# Altium PCB MicroMMC_SM_Cap.PcbDoc
Units mm, origin at the board's own origin, x right, y up, seen from the top; angles counter-clockwise.
Board outline 26 x 25 mm, 2 copper layers (Top Layer, Bottom Layer), stack 1.534 mm thick; 11 components, 2 nets, 26 pads, 0 vias.
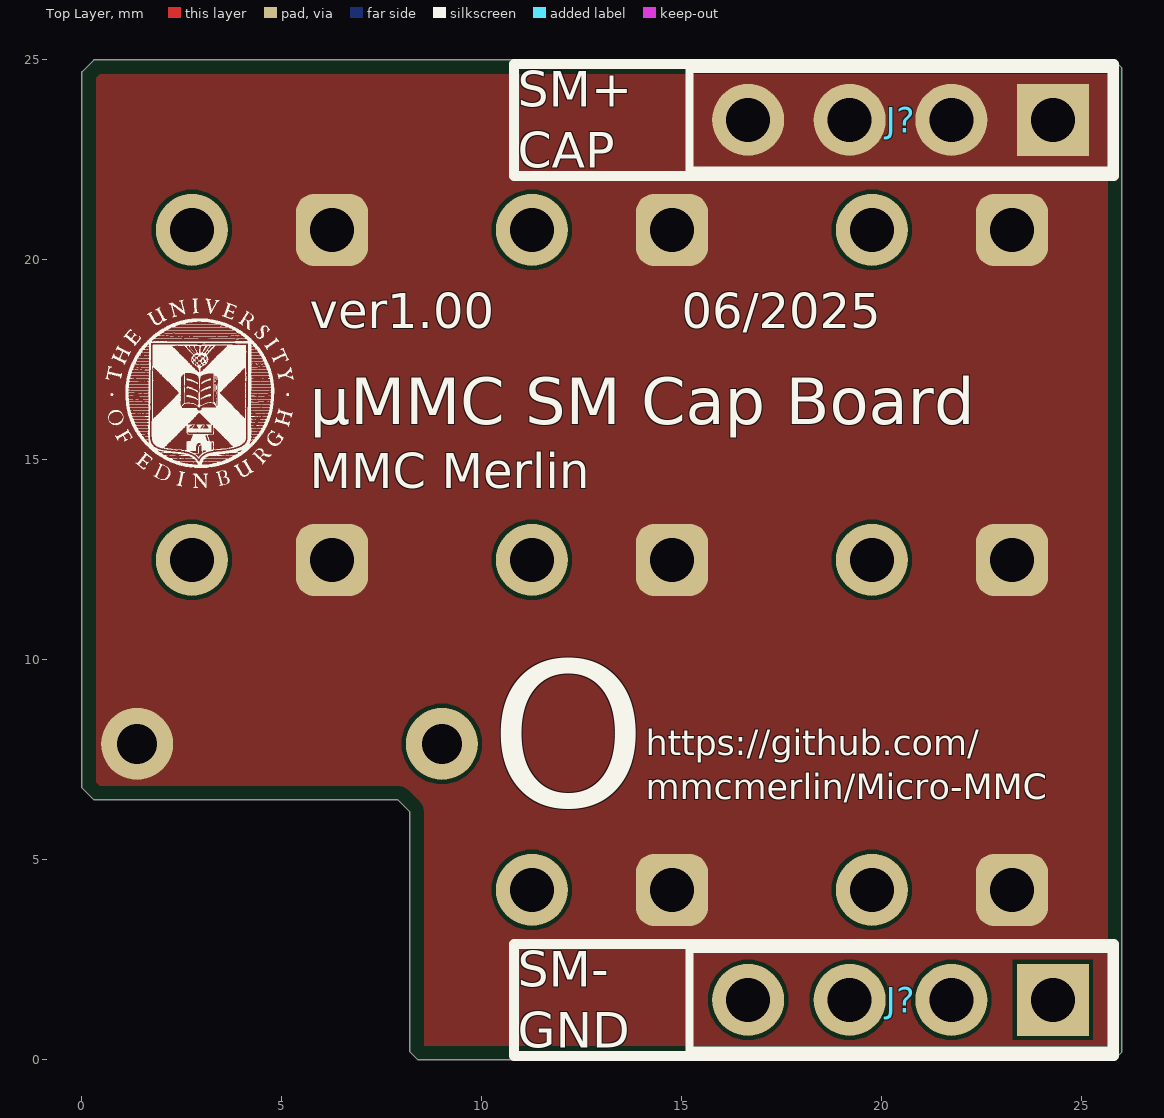
[diagram p0: Top Layer view]
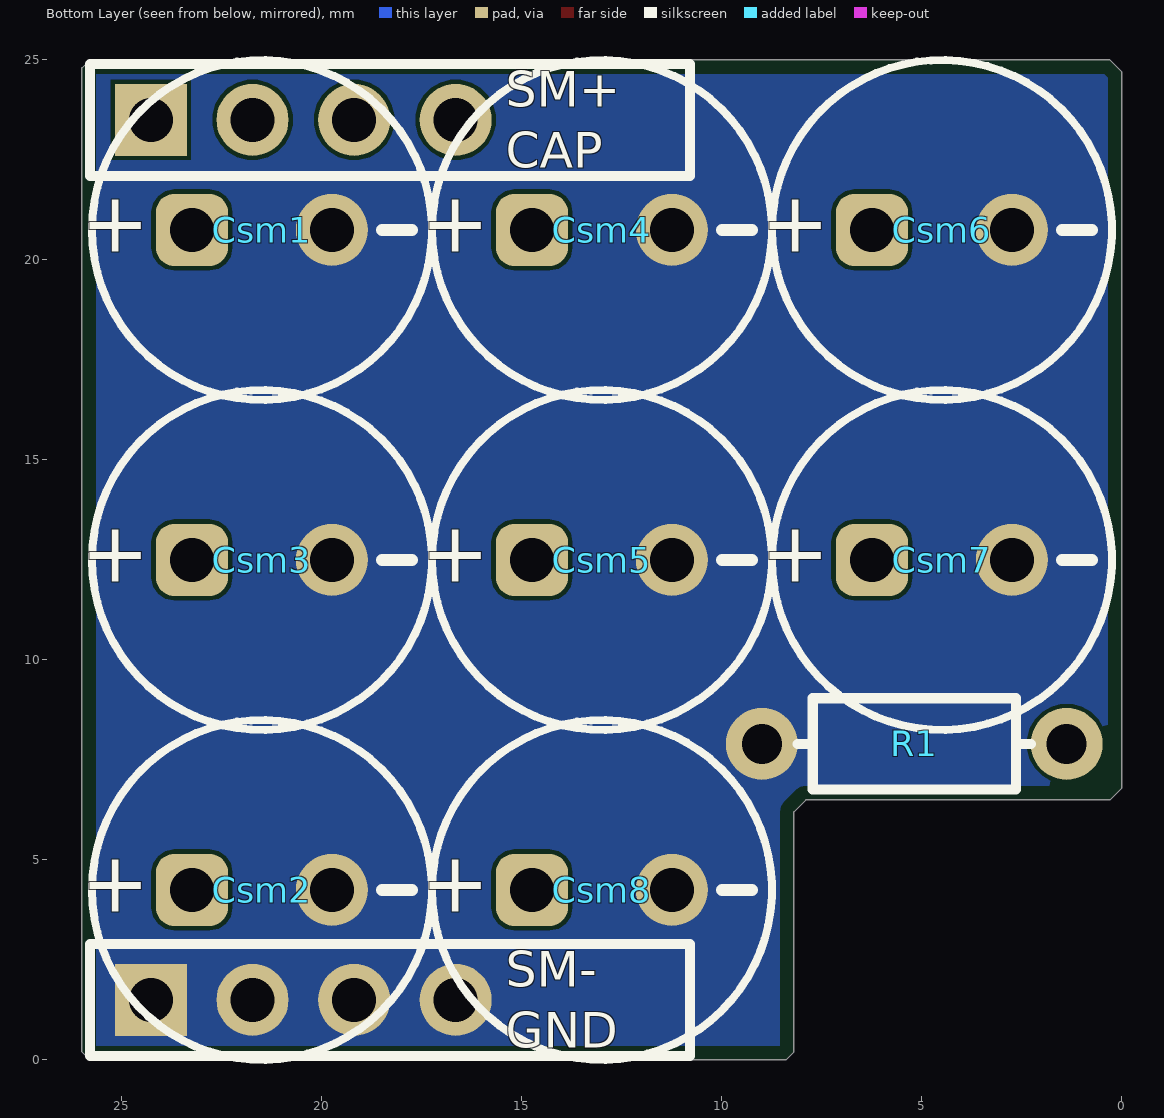
[diagram p1: Bottom Layer view, seen from below]

## Layer stack, top to bottom
Top Solder: solder mask 0.0127, Solder Resist, Dk 3.3
Top Layer: signal copper 0.0178
Dielectric1: core 1.4986, FR-4, Dk 4.3
Bottom Layer: signal copper 0.0178
Bottom Solder: solder mask 0.0127, Solder Resist, Dk 3.3

## Board outline
0,6.8 0,24.7 0.3,25 25.8,25 26,24.8 26,0.2 25.8,0 8.4,0 8.2,0.2 8.2,6.2 7.9,6.5 0.3,6.5

## Design rules (kind name [scope] priority, off if disabled: settings)
BoardOutlineClearance [All] p1: gap=0.35 ignorepadtopadclearanceinfootprint=FALSE
Clearance [All] p1: gap=0.1 ignorepadtopadclearanceinfootprint=FALSE
Height [All] p1: minheight=0 maxheight=100 prefheight=12.7
HoleSize [All] p1: absolutevalues=TRUE maxlimit=6 minlimit=0.25 maxpercent=80.000 minpercent=20.000
HoleToHoleClearance [All] p1: gap=0.6 allowstackedmicrovias=TRUE
MinimumSolderMaskSliver [All] p1: minsoldermaskwidth=0.1
PlaneConnect [All] p1: planeconnectstyle=Direct reliefexpansion=0.508 reliefentries=4 reliefconductorwidth=0.254 reliefairgap=0.254
PolygonConnect [All] p1: connectstyle=Direct reliefconductorwidth=0.254 reliefentries=4 polygonreliefangle="90 Angle" airgapwidth=0.254
RoutingVias [All] p1: holewidth=1 width=2 viastyle="Through Hole" minholewidth=0.3 minwidth=0.45 maxholewidth=6 maxwidth=12
SolderMaskExpansion [Not IsVia] p1: expansion=0.102 istentingtop=FALSE
SolderMaskExpansion SolderMaskExpansion_via [IsVia] p2: expansion=0.102 istentingtop=TRUE
SupplyNets "Schematic Supply Nets_3" [InNet('GND_SM')] p1: voltage=0.000
SupplyNets "Schematic Supply Nets_2" [InNet('VCAP_SM')] p2: voltage=0.000
UnRoutedNet [All] p1: checkbadconnections=TRUE
Width [All] p1: maxlimit=0.762 minlimit=0.152 preferedwidth=0.381
24 further rules are at their usual default settings.

## Classes and differential pairs
component class Schematic: Csm1 Csm2 Csm3 Csm4 Csm5 Csm6 Csm7 Csm8 J? R1

## Components (designator, comment, footprint, x,y, rotation, side; value= is the part's Value field where it differs from the comment)
Csm1 "860010474012" WCAP-ATG8_D8H11.5 21.5,20.75 r0 bottom value=470uF
Csm2 "860010474012" WCAP-ATG8_D8H11.5 21.5,4.25 r0 bottom value=470uF
Csm3 "860010474012" WCAP-ATG8_D8H11.5 21.5,12.5 r0 bottom value=470uF
Csm4 "860010474012" WCAP-ATG8_D8H11.5 13,20.75 r0 bottom value=470uF
Csm5 "860010474012" WCAP-ATG8_D8H11.5 13,12.5 r0 bottom value=470uF
Csm6 "860010474012" WCAP-ATG8_D8H11.5 4.5,20.75 r0 bottom value=470uF
Csm7 "860010474012" WCAP-ATG8_D8H11.5 4.5,12.5 r0 bottom value=470uF
Csm8 "860010474012" WCAP-ATG8_D8H11.5 13,4.25 r0 bottom value=470uF
J? "TSW-104-08-L-S" SMTC-TSW-104-08-X-S 24.275,1.5 r180 top
J? "TSW-104-08-L-S" SMTC-TSW-104-08-X-S 24.275,23.5 r180 top
R1 "R_TH" "Axial 300mil" 1.38,7.9 r0 bottom

## Footprints (in the part's own frame and the unit in brackets; to place one, negate y for a bottom-side part, rotate by r counter-clockwise, add the part's x,y. Pads: shape width x height; smd on the part's side, far side on the other; paste and mask are expansions set on the pad)
"Axial 300mil" [mm] "Through Hole Resistor with 300mil (7.62mm) lead pitch"
  round 1.8 hole 1: 1(0,0) 2(7.62,0)
  silkscreen extent 0.89,-1.14 6.73,1.14, body extent -0.18,-1.16 7.8,1.14, height 2.51
SMTC-TSW-104-08-X-S [mm] ".025 SQ Post Terminal Strip Assembly, 1x4 Pins, Vertical, 2.54mm Pitch, Male"
  rect 1.8x1.8 hole 1.1: 1(0,0)
  round 1.8 hole 1.1: 2(2.54,0) 3(5.08,0) 4(7.62,0)
  silkscreen extent -1.46,-1.27 9.08,1.27, body extent -1.27,-1.27 8.89,1.27, height 8.38
WCAP-ATG8_D8H11.5 [mm] "Aluminum Electrolytic Capacitors, 8x11.5mm"
  rrect50% 1.8x1.8 hole 1.1: 1(1.75,0)
  round 1.8 hole 1.1: 2(-1.75,0)
  silkscreen extent -4.25,-4.25 4.25,4.25, body extent -3.99,-4 3.99,3.99, height 11.81

## Part data
Csm1 Csm2 Csm3 Csm4 Csm5 Csm6 Csm7 Csm8: library part CMP-03913-54007214-1, "860010474012 WCAP-ATG8 Aluminum Electrolytic Capacitors", Capacitance=330µF, Capacitor Type=Aluminium, Case/Package=Radial, Leakage Current=82.5µA, Manufacturer=Panasonic, Manufacturer Part Number=ECA-1CHG471, Max Operating Temperature=85°C, Min Operating Temperature=-40°C, Package Shape=Cylindrical, Package Style=RadialMeter, Rated DC Voltage (URdc)=16V, Ripple Current=451mA, Supplier Part Number 1=667-ECA-1CHG471, Tolerance=20%, Voltage Rating=25V, Category="Aluminum Electrolytic Capacitors", ComponentLink1Description=https://datasheet.ciiva.com:443/pdfs/VipMasterIC/IC/PANA/PANA-S-A0009903858/PANA-S-A0009903858-1.pdf?src-supplier=IHS+Markit, ComponentLink1URL=https://datasheet.ciiva.com:443/pdfs/VipMasterIC/IC/PANA/PANA-S-A0009903858/PANA-S-A0009903858-1.pdf?src-supplier=IHS+Markit, ComponentLink2Description=https://datasheet.ciiva.com/11777/0900766b800301b8-11777772.pdf?src-supplier=Rs, ComponentLink2URL=https://datasheet.ciiva.com/11777/0900766b800301b8-11777772.pdf?src-supplier=Rs, ComponentLink3Description=https://datasheet.ciiva.com/16397/aba0000ce26-16397142.pdf?src-supplier=Future+Electronics, ComponentLink3URL=https://datasheet.ciiva.com/16397/aba0000ce26-16397142.pdf?src-supplier=Future+Electronics, ComponentLink4Description=https://datasheet.ciiva.com/2984/aba0000ce26-2984287.pdf?src-supplier=Avnet, ComponentLink4URL=https://datasheet.ciiva.com/2984/aba0000ce26-2984287.pdf?src-supplier=Avnet, ComponentLink5Description=https://datasheet.ciiva.com/15197/getdatasheetpartid-255238-15197877.pdf?src-supplier=Verical, ComponentLink5URL=https://datasheet.ciiva.com/15197/getdatasheetpartid-255238-15197877.pdf?src-supplier=Verical, ComponentLink6Description=https://datasheet.ciiva.com/46386/1903322-46386215.pdf?src-supplier=Element14, ComponentLink6URL=https://datasheet.ciiva.com/46386/1903322-46386215.pdf?src-supplier=Element14, ComponentLink7Description=https://datasheet.ciiva.com/30106/8aba0000ce26-30106396.pdf?src-supplier=Onlinecomponents.com, ComponentLink7URL=https://datasheet.ciiva.com/30106/8aba0000ce26-30106396.pdf?src-supplier=Onlinecomponents.com, Diameter=8mm, Dielectric Material=Aluminium, Height=11.5mm, Height - Seated (Max)=13.0048mm, JESD-609 Code=e3, Lead Pitch=3.5052mm, Length=11.5mm, Life (Hours)=2000hours, Material=Aluminium, Mount="Through Hole", Mounting Technology="Through Hole", NexarPartId=54007214, Packaging="Tape & Box (TB)", Pins=2, Pitch=3.5mm, Polarity=Polar, Pricing 1="1=0.23, 10=0.168, 50=0.168, 100=0.132, 1000=0.127, 10000=0.114 (USD)", REACH SVHC=Unknown, Reach SVHC Compliant=Yes, RoHS=Compliant, RoHS Compliant=Yes, Stock 1=3498, Supplier 1=Mouser, Tan Delta=0.2, Terminal Finish=Tin, Terminal Pitch=3.5mm, Termination=Wire, Tolerance  (fill in as +-)=20%, Tolerance (fill in as +-)=20%, Voltage Rating (DC)=25V
J? J?: library part CMP-1024-00358-1, "0.025\" SQ Post Header, Through-hole, Vertical, -55 to 125 degC, 2.54 mm Pitch, 4-Pin, Male, RoHS", Flammability Rating="UL94 V-0", Manufacturer=Samtec, Manufacturer Part Number=G800W304018EU, Supplier Part Number 1=3882398, Temperature Range="-55 to 125 degC", Category=Connectors, ComponentLink1Description="Manufacturer URL", ComponentLink1URL=http://www.samtec.com, ComponentLink2Description=Datasheet, ComponentLink2URL=http://www.samtec.com/documents/webfiles/pdf/TSW_TH.PDF, ComponentLink3Description="Package Specification", ComponentLink3URL=http://www.samtec.com/documents/webfiles/cpdf/TSW-XXX-XX-XXX-X-XX-XXX-MKT.pdf, Connector Type="BOARD CONNECTOR", Contact Finish - Mating="GOLD OVER NICKEL (50)", Contact Finish - Termination="Tin (Sn) - with Nickel (Ni) barrier", Contact Gender=Male, Contact Material=Brass, DatasheetVersion=F-214, DIN Conformance=No, Filter Feature=No, IEC Conformance=No, JESD-609 Code=e3, MIL Conformance=No, Mixed Contacts=No, Mounting Style=STRAIGHT, Mounting Technology=Through-hole, Number of Contacts=4, Number of Rows Loaded=1, Option="General Purpose", Orientation=Vertical, PackageDescription=".025[0.64] SQ. Post Terminal Strip Assembly", PackageReference=TSW-104-08-X-S, PackageVersion="DM, 8/1988", PartNumber=TSW-104-08-L-S, Pitch="2.54 mm", Pricing 1="100=0.039, 1000=0.034, 2500=0.033, 5000=0.032, 10000=0.03, 20000=0.028 (GBP)", RoHS=True, RoHS Compliant=Yes, Stock 1=3007, Supplier 1=Farnell, Terminal Pitch=2.54mm, Termination=Solder
R1: library part CMP-009-00508-2, "Through hole resistor 1/4W"

## Nets (pads, with @x,y where several pads share a name; then routed paths per layer and width w, separated by ;. In a path a pad name is that pad's centre, name@x,y a point inside that pad or via, vN(x,y) a via of type N, cw(c..) or ccw(c..) an arc to the next point about the centre after c; other vN are vias at no path point)
GND_SM: Csm1.2 Csm2.2 Csm3.2 Csm4.2 Csm5.2 Csm6.2 Csm7.2 Csm8.2 J?.1@24.275,1.5 J?.2@21.735,1.5 J?.3@19.195,1.5 J?.4@16.655,1.5 R1.2
VCAP_SM: Csm1.1 Csm2.1 Csm3.1 Csm4.1 Csm5.1 Csm6.1 Csm7.1 Csm8.1 J?.1@24.275,23.5 J?.2@21.735,23.5 J?.3@19.195,23.5 J?.4@16.655,23.5 R1.1

## Polygon pours and split planes (outlines as drawn)
VCAP_SM on Top Layer "NONET_L-01_P-001" (solid, remove dead copper, pour order 1): 0,0 26,0 26,25 0,25
GND_SM on Bottom Layer "NONET_L-01_P-001" (solid, remove dead copper, pour order 0): 0,0 26,0 26,25 0,25

## Silkscreen, mask and mechanical layers (free items; w line width, h text height)
Top Overlay:
  drawing of 45 lines, arcs and shapes, not listed
  text "SM+ / CAP" at 10.9,22 h1.52
  text "ver1.00" at 5.7,18 h1.5
  text "06/2025" at 15,18 h1.5
  text "μMMC SM Cap Board" at 5.7,15.5 h2
  text "MMC Merlin" at 5.7,14 h1.5
  text "https://github.com/ / mmcmerlin/Micro-MMC" at 14.1,6.3 h1.1
  text "O" at 10.194,5.004 h7
  text "SM- / GND" at 10.9,0 h1.52
Bottom Overlay:
  lines w0.254: 10.8,0.1 25.8,0.1 25.8,2.9 10.8,2.9 10.8,0.1 ; 10.8,22.1 25.8,22.1 25.8,24.9 10.8,24.9 10.8,22.1
  lines w0.3: 0.75,12.5 1.5,12.5 ; 0.75,20.75 1.5,20.75 ; 9.25,4.25 10,4.25 ; 9.25,12.5 10,12.5 ; 9.25,20.75 10,20.75 ; 17.75,4.25 18.5,4.25 ; 17.75,12.5 18.5,12.5 ; 17.75,20.75 18.5,20.75
  text "SM+ / CAP" at 15.4,22 h1.52
  text "SM- / GND" at 15.4,0 h1.52
Board:
  lines w0.3: 0,6.8 0.3,6.5 7.9,6.5 8.2,6.2 8.2,0.2 8.4,0 25.8,0 26,0.2 26,24.8 25.8,25 0.3,25 0,24.7 0,6.8 ; 2.3,25 2.3,25
Dimensions:
  region: 15.3,0.1 15.3,2.9 25.8,2.9 25.8,22.35 15.3,22.35 15.3,25.1 0,25.1 0,6.6 8,6.6 8,0.1
  lines w0.254: 0,0.1 26,0.1 26,25.1 0,25.1 0,0.1
  lines w0.3: 0,6.5 12.3,6.5 ; 19.195,1.5 19.195,23.5 ; 21.735,1.5 21.735,23.5 ; 16.655,1.5 16.655,23.5 24.275,23.5 24.275,1.5 16.655,1.5

## Text inside footprints (layer, text, board x,y; h text height)
Csm1: Bottom Overlay "+" at 24.3,21.5 h1.5 r180
Csm2: Bottom Overlay "+" at 24.3,5 h1.5 r180
Csm3: Bottom Overlay "+" at 24.3,13.25 h1.5 r180
Csm4: Bottom Overlay "+" at 15.8,21.5 h1.5 r180
Csm5: Bottom Overlay "+" at 15.8,13.25 h1.5 r180
Csm6: Bottom Overlay "+" at 7.3,21.5 h1.5 r180
Csm7: Bottom Overlay "+" at 7.3,13.25 h1.5 r180
Csm8: Bottom Overlay "+" at 15.8,5 h1.5 r180